# Altium PCB TYH-PD67W 2C1A 主板0722.pcbdoc (part 2 of 2)
Units mm, origin at the board's own origin, x right, y up, seen from the top; angles counter-clockwise.
Board outline 42.31 x 42.1 mm, 5 copper layers (Top Layer, Signal Layer 3, Signal Layer 1, Signal Layer 2, Bottom Layer), stack 0.941 mm thick; 52 components, 178 nets, 147 pads, 295 vias.
Unrouted connection lines stored in the file: 1.
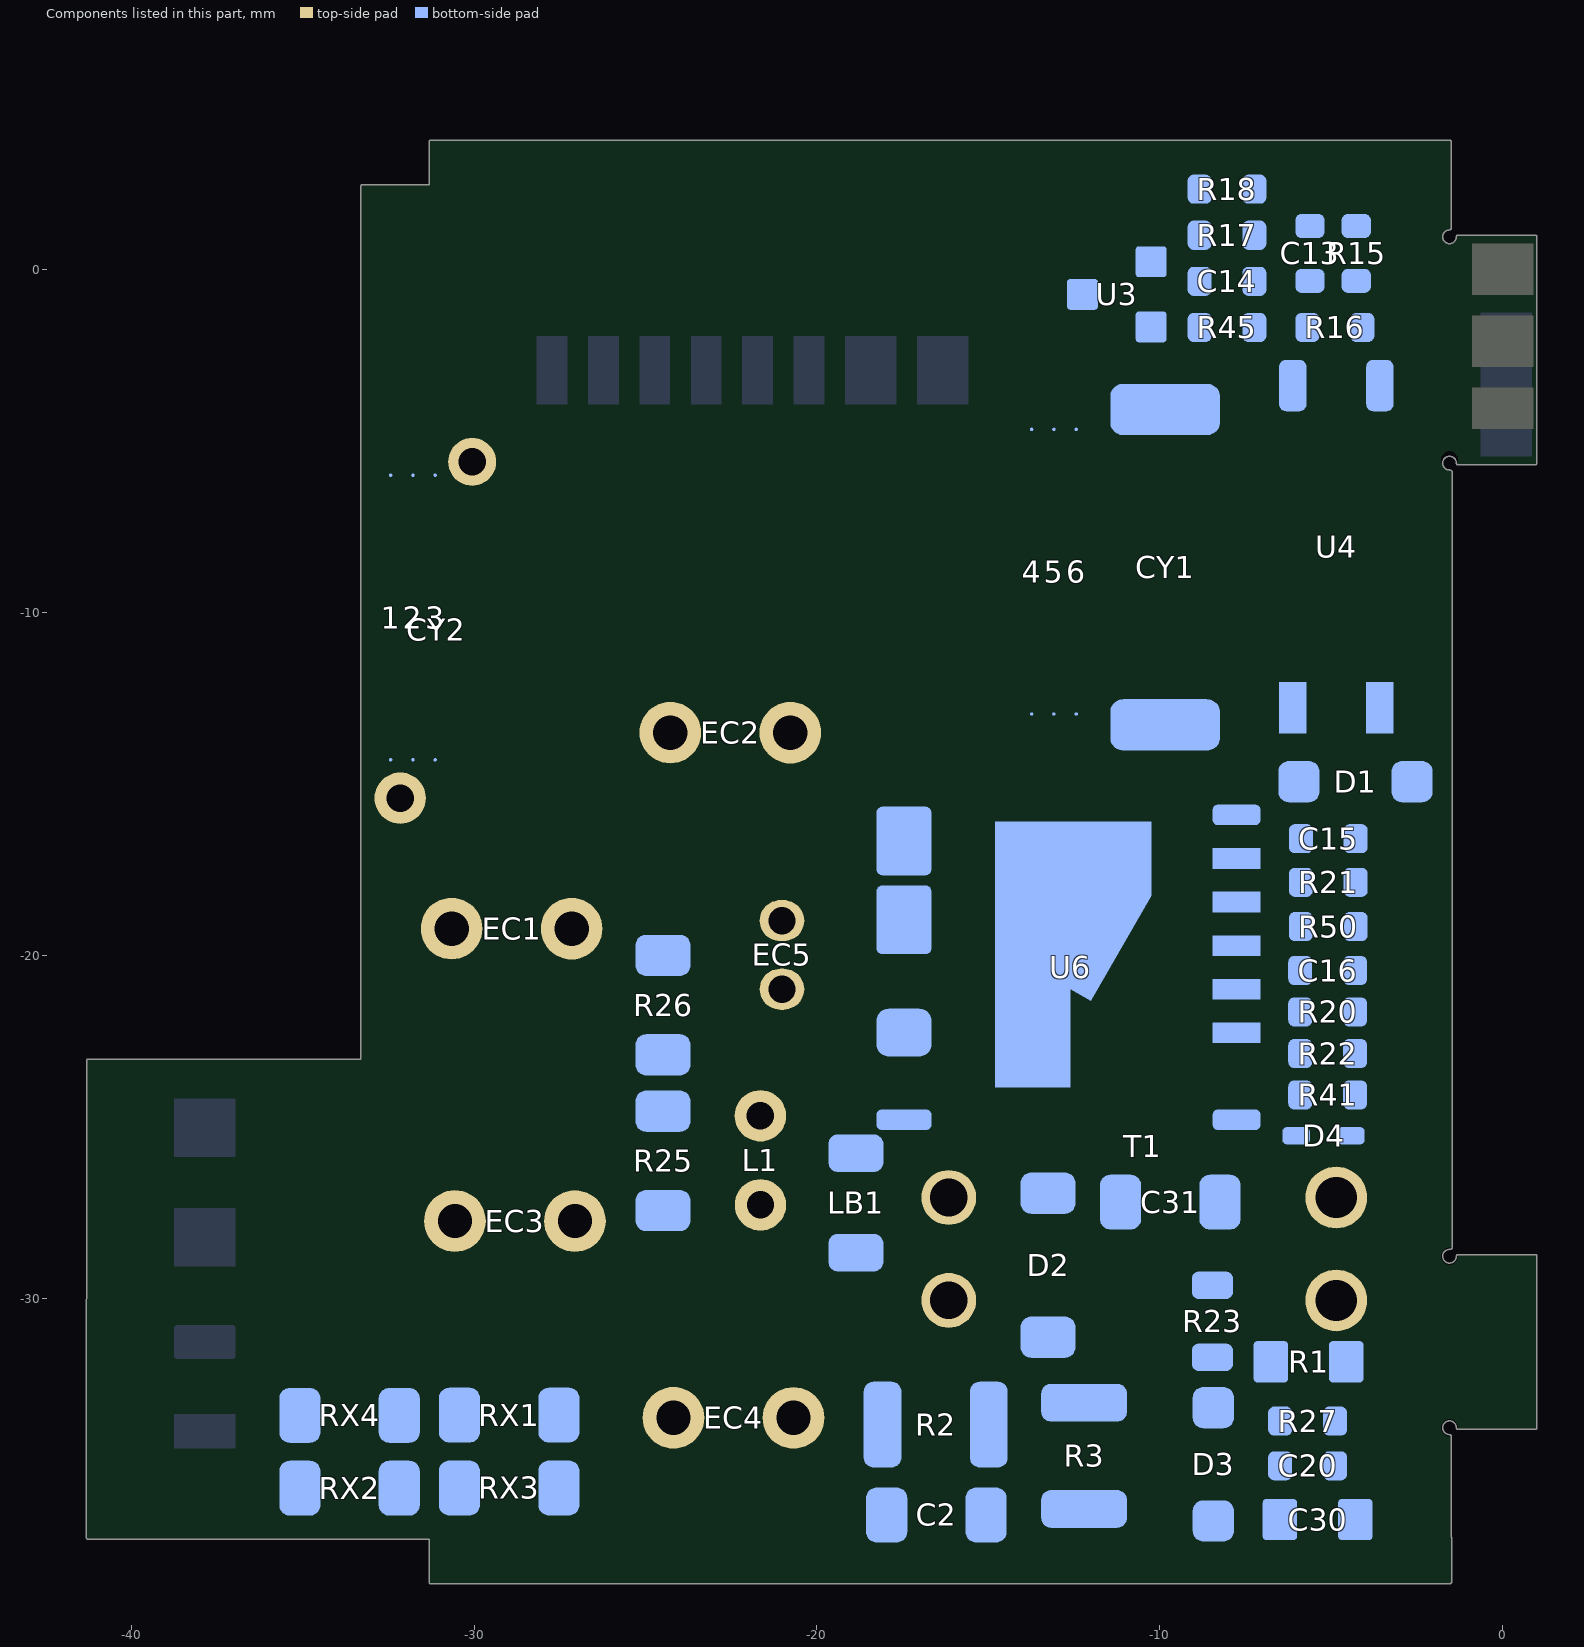
[diagram p4: the components of this part, seen from the top]

## Other copper (continued)
Bottom Layer:
  region net NetBD1_1: -28.004,-32.585 -27.016,-32.585 -26.855,-32.746 -26.855,-36.116 -26.472,-36.499 -26.472,-37.358 -26.648,-37.534 -28.045,-37.534 -28.241,-37.339 -28.241,-32.822
  region net NetN_1: -38.747,-33.364 -38.747,-35.85 -38.138,-36.459 -34.57,-36.459 -34.435,-36.324 -34.435,-32.747 -34.598,-32.584 -35.51,-32.584 -36.291,-33.364
  region net ISET: -8.464,-20.685 -8.464,-22.768 -7.934,-23.298 -5.645,-23.298 -5.532,-23.185 -5.532,-22.529 -5.625,-22.436 -6.569,-22.436 -6.81,-22.195 -6.81,-20.928 -7.053,-20.685
  region net NewNet33: -10.882,-0.539 -10.618,-0.803 -8.518,-0.803 -8.387,-0.672 -8.387,3.016 -8.823,3.451 -11.15,3.451 -11.457,3.145 -10.882,2.57
  region net SWDIO: -22.179,-3.945 -22.179,-1.486 -22.021,-1.329 -21.436,-1.329 -21.275,-1.49 -21.275,-3.945
  region net SWDIO: 0.851,-5.446 -1.105,-5.446 -1.416,-5.134 -1.416,-5.094 -1.732,-5.094 -1.876,-4.95 -1.377,-4.451 0.851,-4.451
  region net SWCLK: 0.844,-2.851 -0.962,-2.851 -1.508,-3.396 -1.508,-3.754 -1.412,-3.849 0.844,-3.849
  region net SWCLK: -23.679,-3.945 -23.679,-1.486 -23.521,-1.329 -22.936,-1.329 -22.775,-1.49 -22.775,-3.945
  region net NewNet33: -28.179,-3.945 -28.179,-1.486 -27.728,-1.036 -27.275,-1.49 -27.275,-3.945
  region net NetRX3_2: -32.76,-32.491 -29.955,-32.491 -29.749,-32.697 -29.749,-36.214 -29.973,-36.437 -32.735,-36.437 -32.945,-36.227 -32.945,-32.677
  region net SGND: -32.799,-6.023 -30.863,-6.023 -30.432,-6.453 -29.749,-6.453 -29.2,-5.904 -29.2,-4.782 -29.852,-4.13 -32.724,-4.13 -32.962,-4.368 -32.962,-5.86
  region net NetR15_1: -25.147,-22.242 -23.827,-22.242 -23.647,-22.422 -23.647,-24.974 -23.843,-25.17 -25.133,-25.17 -25.324,-24.979 -25.324,-22.419
  region net PGND: -7.979,-14.255 -19.806,-14.255 -20.066,-14.515 -21.431,-14.515 -21.88,-14.066 -21.88,-12.923 -21.335,-12.377 -16.763,-12.377 -15.984,-13.156 -12.117,-13.156 -11.382,-12.422 -7.909,-12.422 -7.631,-12.7 -7.631,-13.907
  region net PGND: -8.726,-25.722 -7.079,-25.722 -6.912,-25.889 -6.912,-28.286 -7.227,-28.6 -8.798,-28.6 -8.942,-28.456 -8.942,-25.938
  region net NetBD1_1: -38.721,-30.762 -36.892,-30.762 -36.707,-30.946 -36.707,-31.572 -36.913,-31.778 -38.731,-31.778
  region net OPTO: -8.544,-1.207 -8.381,-1.37 -8.381,-2.032 -8.582,-2.232 -11.523,-2.232 -11.617,-2.138 -11.617,-1.881 -10.943,-1.207
  region net A: -7.601,0.127 -6.791,0.127 -6.653,-0.012 -6.653,-1.888 -6.945,-2.181 -7.535,-2.181 -7.689,-2.027 -7.689,0.039
  region net SGND: -8.974,-2.676 -14.137,-2.676 -14.377,-2.916 -14.377,-4.102 -14.132,-4.348 -12.061,-4.348 -11.445,-4.964 -8.51,-4.964 -8.105,-4.559 -8.105,-3.545
  region net SGND: -13.299,0.507 -11.844,0.507 -11.621,0.283 -11.621,-1.055 -11.89,-1.324 -13.103,-1.324 -13.482,-0.945 -13.482,0.323
  region net NetD4_K: -6.548,-12.018 -5.368,-12.018 -4.967,-12.419 -4.967,-15.264 -5.32,-15.617 -6.355,-15.617 -6.573,-15.399 -6.573,-12.043
  region net PGND: -4.563,-18.354 -3.974,-18.354 -3.841,-18.221 -3.841,-16.319 -3.233,-15.711 -2.18,-15.711 -1.922,-15.453 -1.922,-14.481 -2.759,-13.644 -2.759,-12.158 -2.901,-12.016 -4.102,-12.016 -4.25,-12.164 -4.25,-15.247 -4.629,-15.626 -4.629,-15.644 -4.696,-15.711 -4.696,-18.222
  region net SGND: -19.188,-3.734 -19.188,-1.262 -18.881,-0.955 -17.916,-0.955 -17.672,-1.199 -17.678,-1.205 -17.678,-3.734
  region net VIN: -7.551,1.459 -6.367,1.459 -6.061,1.765 -3.942,1.765 -2.987,0.811 -2.987,-0.45 -2.724,-0.714 -2.724,-2.267 -2.852,-2.395 -3.298,-1.949 -3.298,-0.902 -3.483,-0.716 -3.483,0.248 -3.745,0.51 -7.498,0.51 -7.66,0.673 -7.66,1.35
  region net NetC21_1: -6.629,-4.229 -5.415,-4.229 -5.246,-4.06 -5.246,-1.016 -5.002,-0.772 -3.878,-0.772 -3.761,-0.655 -3.761,-0.066 -3.982,0.154 -6.108,0.154 -6.223,0.04 -6.223,-2.148 -6.796,-2.721 -6.796,-4.063
  region net OPTO: -4.584,-1.206 -3.805,-1.206 -3.643,-1.368 -3.643,-2.209 -3.114,-2.738 -3.114,-4.078 -3.246,-4.21 -4.598,-4.21 -4.721,-4.087 -4.721,-1.343
  region net VIN: -2.244,-2.512 -1.754,-2.022 -1.754,-1.684 -2.724,-0.714 -3.11,-0.714 -3.298,-0.902 -3.298,-1.949 -2.735,-2.512
  region net VIN: -16.851,-1.506 -15.11,-1.506 -14.83,-1.786 -14.83,-3.44 -15.322,-3.932 -17.044,-3.932 -17.044,-1.699
  region net SGND: -19.188,1.937 -18.383,2.742 -11.639,2.742 -11.429,2.533 -11.429,-0.864 -11.89,-1.324 -13.103,-1.324 -13.482,-0.945 -17.193,-0.945 -17.889,-1.641 -17.889,-1.805 -18.973,-1.805 -19.188,-1.589
  region net VOUT1: -20.679,-3.945 -20.679,-1.486 -20.521,-1.329 -19.936,-1.329 -19.775,-1.49 -19.775,-3.945
  region net SDA: -26.679,-3.945 -26.679,-1.486 -26.521,-1.329 -25.936,-1.329 -25.775,-1.49 -25.775,-3.945
  region net SDA: 0.859,0.358 -1.553,0.358 -2,-0.089 -2,-1.006 -1.954,-1.052 -1.462,-1.052 -1.061,-0.652 0.859,-0.652
  region net SCL: -25.179,-3.945 -25.179,-1.486 -25.021,-1.329 -24.436,-1.329 -24.275,-1.49 -24.275,-3.945
  region net SCL: 0.838,-1.249 -1.144,-1.249 -1.432,-1.537 -1.432,-2.503 -1.345,-2.589 -1.002,-2.246 0.838,-2.246
  region net NetBD1_3: -38.718,-25.876 -33.037,-25.876 ccw(c-33.037,-23.336) -31.241,-25.132 -30.421,-24.312 ccw(c-32.217,-22.516) -29.677,-22.516 -29.677,-19.578 cw(c-27.137,-19.578) -28.933,-17.781 -27.963,-16.812 cw(c-26.167,-18.608) -26.167,-16.068 -24.42,-16.068 ccw(c-24.42,-14.957) -23.309,-14.957 -23.309,-13.314 ccw(c-24.107,-13.314) -24.107,-12.516 -25.746,-12.516 ccw(c-25.746,-15.056) -27.542,-13.26 -30.605,-16.323 ccw(c-28.809,-18.119) -31.349,-18.119 -31.349,-18.395 cw(c-31.523,-18.395) -31.523,-18.569 cw(c-31.523,-18.383) -31.709,-18.383 -31.709,-17.261 cw(c-30.566,-17.261) -31.374,-16.453 -31.116,-16.194 ccw(c-31.864,-15.446) -30.806,-15.446 -30.806,-14.652 -30.931,-14.527 -32.633,-14.527 ccw(c-32.633,-14.961) -33.067,-14.961 -33.067,-18.804 ccw(c-32.396,-18.804) -32.396,-19.475 -31.74,-19.475 cw(c-31.74,-19.636) -31.58,-19.636 cw(c-31.735,-19.636) -31.735,-19.79 -32.629,-19.79 ccw(c-32.629,-20.201) -33.039,-20.201 -33.039,-22.989 cw(c-33.359,-22.989) -33.359,-23.309 -38.718,-23.309
  region net NetL2_1: -19.414,-26.502 -18.258,-26.502 ccw(c-18.258,-26.215) -17.971,-26.215 cw(c-17.03,-26.215) -17.03,-25.273 -16.932,-25.273 ccw(c-16.932,-24.957) -16.616,-24.957 -16.616,-21.971 ccw(c-17.071,-21.971) -17.071,-21.515 -17.972,-21.515 ccw(c-17.972,-21.878) -18.229,-21.621 -18.954,-22.347 ccw(c-17.158,-24.143) -19.698,-24.143 -19.698,-26.222 ccw(c-19.42,-26.222) -19.42,-26.5
  region net NetC1_2: -15.409,-37.277 cw(c-15.409,-36.747) -15.938,-36.747 -15.938,-33.054 cw(c-15.626,-33.054) -15.847,-32.833 -15.529,-32.515 cw(c-15.234,-32.811) -15.234,-32.393 -14.727,-32.393 cw(c-14.727,-32.73) -14.39,-32.73 -14.39,-34.317 ccw(c-13.687,-34.317) -13.687,-35.02 -11.635,-35.02 cw(c-11.635,-35.698) -10.957,-35.698 -10.957,-36.88 cw(c-11.351,-36.88) -11.351,-37.274
  region net NetC2_2: -13.45,-30.48 -12.457,-30.48 cw(c-12.457,-32.043) -10.893,-32.043 -10.893,-33.363 cw(c-11.228,-33.363) -11.228,-33.698 -13.175,-33.698 cw(c-13.175,-33.41) -13.463,-33.41 -13.463,-32.686 ccw(c-14.619,-32.686) -13.801,-31.868 -14.048,-31.622 cw(c-13.886,-31.461) -14.114,-31.461 -14.114,-30.801 cw(c-13.793,-30.801) -13.793,-30.479
  region net NetC4_2: -5.021,-29.137 -4.244,-29.137 cw(c-4.244,-29.441) -3.94,-29.441 -3.94,-32.321 cw(c-4.174,-32.321) -4.174,-32.554 -4.917,-32.554 cw(c-4.917,-32.253) -5.218,-32.253 -5.218,-31.707 ccw(c-6.513,-31.707) -5.597,-30.792 cw(c-5.038,-30.233) -5.829,-30.233 -5.829,-29.44 cw(c-5.527,-29.44) -5.527,-29.138
  region net NetC4_1: -5.083,-33.103 -4.478,-33.103 cw(c-4.478,-33.321) -4.261,-33.321 -4.261,-35.074 cw(c-4.551,-35.074) -4.551,-35.365 -5.114,-35.365 cw(c-5.114,-35.186) -5.293,-35.186 -5.293,-33.289 cw(c-5.107,-33.289) -5.107,-33.103
  region net Bais-L: -8.927,-31.194 -6.31,-31.194 cw(c-6.31,-31.426) -6.078,-31.426 -6.078,-33.875 cw(c-6.299,-33.875) -6.299,-34.096 -8.718,-34.096 cw(c-8.718,-33.542) -9.272,-33.542 -9.272,-31.382 cw(c-9.084,-31.382) -9.084,-31.194
  region net NetC6_1: -8.958,-37.424 -6.307,-37.424 ccw(c-6.307,-37.02) -5.903,-37.02 -5.903,-34.687 ccw(c-6.134,-34.687) -6.134,-34.457 -8.876,-34.457 ccw(c-8.876,-34.852) -9.271,-34.852 -9.271,-37.128 ccw(c-8.975,-37.128) -8.975,-37.425
  region net PGND: -5.186,-37.469 -3.917,-37.469 ccw(c-3.917,-37.285) -3.733,-37.285 -3.733,-35.943 ccw(c-3.872,-35.943) -3.872,-35.805 -5.171,-35.805 ccw(c-5.171,-35.99) -5.356,-35.99 -5.356,-37.295 ccw(c-5.186,-37.295) -5.186,-37.465
  region net NetC6_1: -24.779,-20.646 -23.979,-20.646 ccw(c-23.979,-20.105) -23.596,-20.488 -23.507,-20.399 cw(c-21.711,-22.195) -21.711,-19.655 -20.937,-19.655 ccw(c-20.937,-19.05) -20.333,-19.05 -20.333,-18.895 ccw(c-20.892,-18.895) -20.892,-18.336 -23.413,-18.336 ccw(c-23.413,-20.524) -24.961,-18.977 -25.053,-19.069 ccw(c-24.41,-19.711) -25.319,-19.711 -25.319,-20.342 ccw(c-25.014,-20.342) -25.014,-20.647
  region net M: -9.122,-29.988 -9.122,-29.32 cw(c-8.933,-29.32) -8.933,-29.132 -7.344,-29.132 ccw(c-7.344,-28.47) -6.876,-28.938 -6.321,-28.383 cw(c-6.168,-28.536) -6.168,-28.32 -6.167,-28.32 cw(c-6.167,-28.583) -5.904,-28.583 -5.904,-28.59 cw(c-6.133,-28.59) -5.971,-28.752 -7.146,-29.927 cw(c-7.651,-29.422) -7.651,-30.136 -8.974,-30.136 cw(c-8.974,-29.988)
  region net SW: -19.428,-28.02 -19.387,-28.02 ccw(c-19.387,-25.672) -17.726,-27.332 -17.304,-26.91 ccw(c-17.867,-26.348) -17.071,-26.348 cw(c-16.737,-26.348) -16.737,-26.014 -10.979,-26.014 cw(c-10.979,-26.514) -10.479,-26.514 -10.479,-27.72 cw(c-10.782,-27.72) -10.782,-28.022 -11.841,-28.022 cw(c-11.841,-27.76) -12.027,-27.946 ccw(c-12.168,-28.087) -12.168,-27.887 -16.477,-27.887 ccw(c-16.477,-28.858) -17.163,-28.171 -18.207,-29.216 cw(c-18.338,-29.085) -18.338,-29.27 -19.434,-29.27 cw(c-19.434,-29.003) -19.701,-29.003 -19.701,-28.293 cw(c-19.428,-28.293)
  region net SW: -11.841,-28.027 -17.092,-28.027 cw(c-17.092,-27.856) -17.264,-27.856 cw(c-17.037,-27.856) -17.037,-27.63 -11.841,-27.63 cw(c-11.841,-27.802) -11.668,-27.802 -11.668,-27.854 cw(c-11.841,-27.854)
Multi-Layer:
  pour cut-out: -6.072,-27.724 -6.072,-26.413 -5.484,-25.825 -4.2,-25.825 -3.543,-26.482 -3.543,-27.724 -4.186,-28.367 -5.429,-28.367
  pour cut-out: -5.295,-35.617 -4.879,-35.617 -4.633,-35.863 -4.633,-37.568 -4.763,-37.698 -5.369,-37.698 -5.55,-37.517 -5.55,-35.872

## Silkscreen, mask and mechanical layers (free items; w line width, h text height)
Top Overlay:
  circle w0.05: c-4.853,-24.068 r2
  circle w0.025: c-16.153,-30.068 r2.3
  lines w0.05: -39.8,-37.781 -39.8,-23.081 ; -38.8,-37.781 -38.8,-23.081 ; -38.8,-35.32 -31.3,-35.32 -31.3,-30.92 -38.8,-30.92 ; -38.8,-30.677 -33.4,-30.677 -33.4,-20.677 -38.8,-20.677 -38.8,-30.677
  lines w0.1: -33.25,-5.074 -1.55,-5.074 ; -33.25,-4.074 -1.55,-4.074 ; -31.26,2.419 -1.55,2.419 ; -31.259,-37.739 -1.549,-37.739 ; -31.25,-36.983 -1.541,-36.983 ; -28.725,-4.074 -28.725,5.976 -23.002,5.976 -23.002,-4.074 ; -18.426,-4.074 -18.426,5.976 -15.216,5.976 -15.216,-4.074 ; -10.426,-4.066 -10.426,5.984 -7.216,5.984 -7.216,-4.066 ; -1.5,-36.686 -1.5,2.332 -0.5,2.332 -0.5,-36.686 -1.5,-36.686
Bottom Overlay:
  lines w0.1: -1.55,-5.074 -1.55,-4.074
Bottom Solder:
  region: -15.053,-24.002 -15.053,-15.965 -10.121,-15.965 -10.121,-18.274 -11.989,-21.501 -11.989,-24.002
  region: -19.606,-19.978 -16.681,-19.978 -16.552,-19.849 -16.552,-15.138 -16.875,-14.814 -19.185,-14.814 -19.594,-15.224 -20.92,-15.224 -21.441,-15.745 -21.441,-17.399 -21.069,-17.771 -20.324,-17.771 -19.803,-18.293 -19.803,-19.781
  lines w1: -35.568,-24.871 -34.314,-24.871 ; -32.742,-24.722 -31.722,-23.702 ; -31.135,-22.436 -31.135,-21.264 ; -30.017,-17.502 -30.017,-17.304 -28.659,-15.947 ; -29.383,-25.814 -27.934,-24.365 ; -27.591,-22.85 -27.591,-21.265 ; -27.301,-14.787 -26.34,-13.825 ; -22.923,-29.35 -22.044,-30.228 ; -21.149,-31.299 -18.637,-31.299 ; -17.208,-31.124 -16.153,-30.068

## Text inside footprints (layer, text, board x,y; h text height)
D2: Bottom Overlay "+" at -12.902,-27.95 h1 r90
EC1: Top Overlay "+" at -31.409,-16.897 h1 r90
EC2: Top Overlay "+" at -24.75,-11.808 h1 r90; Top Overlay "-" at -21.034,-15.345 h1 r90
EC3: Top Overlay "+" at -26.3,-30.084 h1 r270
EC4: Top Overlay "+" at -19.926,-35.822 h1 r270